# EAGLE board 4WD-Electric-Vehicle-Control-System (EAGLE 9.7.0)

Size 322.51 x 180.07 mm. Coordinates in mm from the lower left corner, seen from the top.
Outline: 0,0 322.51,0 322.51,180.07 0,180.07 0,0
Copper layers (1*16): Top 0.035mm / dielectric 1.5mm / Bottom 0.035mm
Design rules "default": minimum track width 6mil, minimum drill 0.35mm, track to track 6mil, track to pad 6mil, pad to pad 6mil, via to via 6mil, smd to smd 6mil, copper to edge 40mil, drill to drill 6mil, minimum pad ring 10mil, minimum via ring 8mil, stop-mask expansion 4mil, vias tented up to drill 0mil, thermal gap 10mil

## Footprints (pad centres in the part's own frame; a part is rotated, then mirrored left to right if it is on the bottom)
1X06 = drill 1.016 long: 1 -6.35,0; 2 -3.81,0; 3 -1.27,0; 4 1.27,0; 5 3.81,0; 6 6.35,0
BATTERY-GENERIC = drill 1.118 pad 3.15 octagon: + 2.54,0; - -2.54,0
HA-06-SM065 = drill 1 pad 1.676: 1 -2.54,-2.54; 2 0,2.54; 3 2.54,-2.54
SG90 = drill 1.016 long: 1 -2.54,0; 2 0,0; 3 2.54,0
ARDUINO-UNO-R3-SHIELD = drill 1.016 pad 1.88: 3.3V 24.13,-2.54; 5V 24.13,0; A0 24.13,12.7; A1 24.13,15.24; A2 24.13,17.78; A3 24.13,20.32; A4 24.13,22.86; A5 24.13,25.4; AREF -24.13,-13.97; D2 -24.13,20.32; D3 -24.13,17.78; D4 -24.13,15.24; D5 -24.13,12.7; D6 -24.13,10.16; D7 -24.13,7.62; D8 -24.13,3.81; D9 -24.13,1.27; D10 -24.13,-1.27; D11 -24.13,-3.81; D12 -24.13,-6.35; D13 -24.13,-8.89; GND@0 24.13,2.54; GND@1 24.13,5.08; GND@2 -24.13,-11.43; IOREF 24.13,-7.62; NC 24.13,-10.16; RES 24.13,-5.08; RX -24.13,25.4; SCL -24.13,-19.05; SDA -24.13,-16.51; TX -24.13,22.86; VIN 24.13,7.62
DIP762W53P254L1969H508Q16B = drill 0.743 pad 1.343: 1 -3.81,8.89; 2 -3.81,6.35; 3 -3.81,3.81; 4 -3.81,1.27; 5 -3.81,-1.27; 6 -3.81,-3.81; 7 -3.81,-6.35; 8 -3.81,-8.89; 9 3.81,-8.89; 10 3.81,-6.35; 11 3.81,-3.81; 12 3.81,-1.27; 13 3.81,1.27; 14 3.81,3.81; 15 3.81,6.35; 16 3.81,8.89

## Placement (x,y rotation side)
M1  PINHD-1X06_1X06M  [1X06]  238.54,173.8 0 top
M2  PINHD-1X06_1X06M  [1X06]  12.2,171.36 0 top
M3  PINHD-1X06_1X06M  [1X06]  10.79,6.66 180 top
M4  PINHD-1X06_1X06M  [1X06]  239.5,6.27 180 top
P1  BATTERYGENERIC  [BATTERY-GENERIC]  60.4,152.36 180 top
RPOT1  250k  [HA-06-SM065]  168.26,60.32 0 top
RPOT2  250k  [HA-06-SM065]  315.46,77.05 0 top
SERVO2  SERVOSG90  [SG90]  295.19,107.76 90 top
U1  ARDUINO-UNO-R3-SHIELD  [ARDUINO-UNO-R3-SHIELD]  94.33,49.11 270 top
U2  L293E  [DIP762W53P254L1969H508Q16B]  21.53,115.55 90 top
U3  L293E  [DIP762W53P254L1969H508Q16B]  250.63,114.73 90 top

## Library data of the parts
M1-M4 P1 RPOT1 RPOT2 SERVO2 U1-U3 = Tinkercad

## Nets
P1+: P1.+ U2.8 U3.8
P1-: M1.5 P1.- RPOT1.1 RPOT2.3 SERVO2.1 U1.GND@0 U1.GND@1 U1.GND@2 U2.4 U2.5 U2.12 U2.13 U3.4 U3.5 U3.12 U3.13
U1_5V: RPOT1.3 RPOT2.1 SERVO2.2 U1.5V U2.16 U3.16
U1_A0: RPOT1.2 U1.A0
U1_A1: RPOT2.2 U1.A1
U1_D3: U1.D3 U3.1
U1_D5: U1.D5 U3.9
U1_D6: U1.D6 U2.1 U2.9
U1_D7: U1.D7 U2.2 U2.10 U3.2 U3.10
U1_D8: U1.D8 U2.7 U2.15 U3.7 U3.15
U1_D9: SERVO2.3 U1.D9
U2_1Y: M2.1 U2.3
U2_2Y: M2.6 U2.6
U2_3Y: M3.1 U2.11
U2_4Y: M3.6 U2.14
U3_1Y: M1.1 U3.3
U3_2Y: M1.6 U3.6
U3_3Y: M4.1 U3.11
U3_4Y: M4.6 U3.14

## Tracks (layer width: path | path; a pad name or v marks a point on that pad's centre or on a via)
P1+  (2 unrouted)
P1-  (15 unrouted)
U1_5V  (5 unrouted)
U1_A0  (1 unrouted)
U1_A1  (1 unrouted)
U1_D3  (1 unrouted)
U1_D5  (1 unrouted)
U1_D6  (2 unrouted)
U1_D7  (4 unrouted)
U1_D8  (4 unrouted)
U1_D9  (1 unrouted)
U2_1Y  (1 unrouted)
U2_2Y  (1 unrouted)
U2_3Y  (1 unrouted)
U2_4Y  (1 unrouted)
U3_1Y  (1 unrouted)
U3_2Y  (1 unrouted)
U3_3Y  (1 unrouted)
U3_4Y  (1 unrouted)